# Altium PCB Zybo_Z7_Pcb.PcbDoc (part 5 of 8)
Units mm, origin at the board's own origin, x right, y up, seen from the top; angles counter-clockwise.
Board outline 122 x 88 mm, 8 copper layers (Top Layer, Layer 2, Layer 3, Layer 4, Layer 5, Layer 6, Layer 7, Bottom Layer), stack 1.625 mm thick; 658 components, 558 nets, 2538 pads, 924 vias.
Unrouted connection lines stored in the file: 1229.
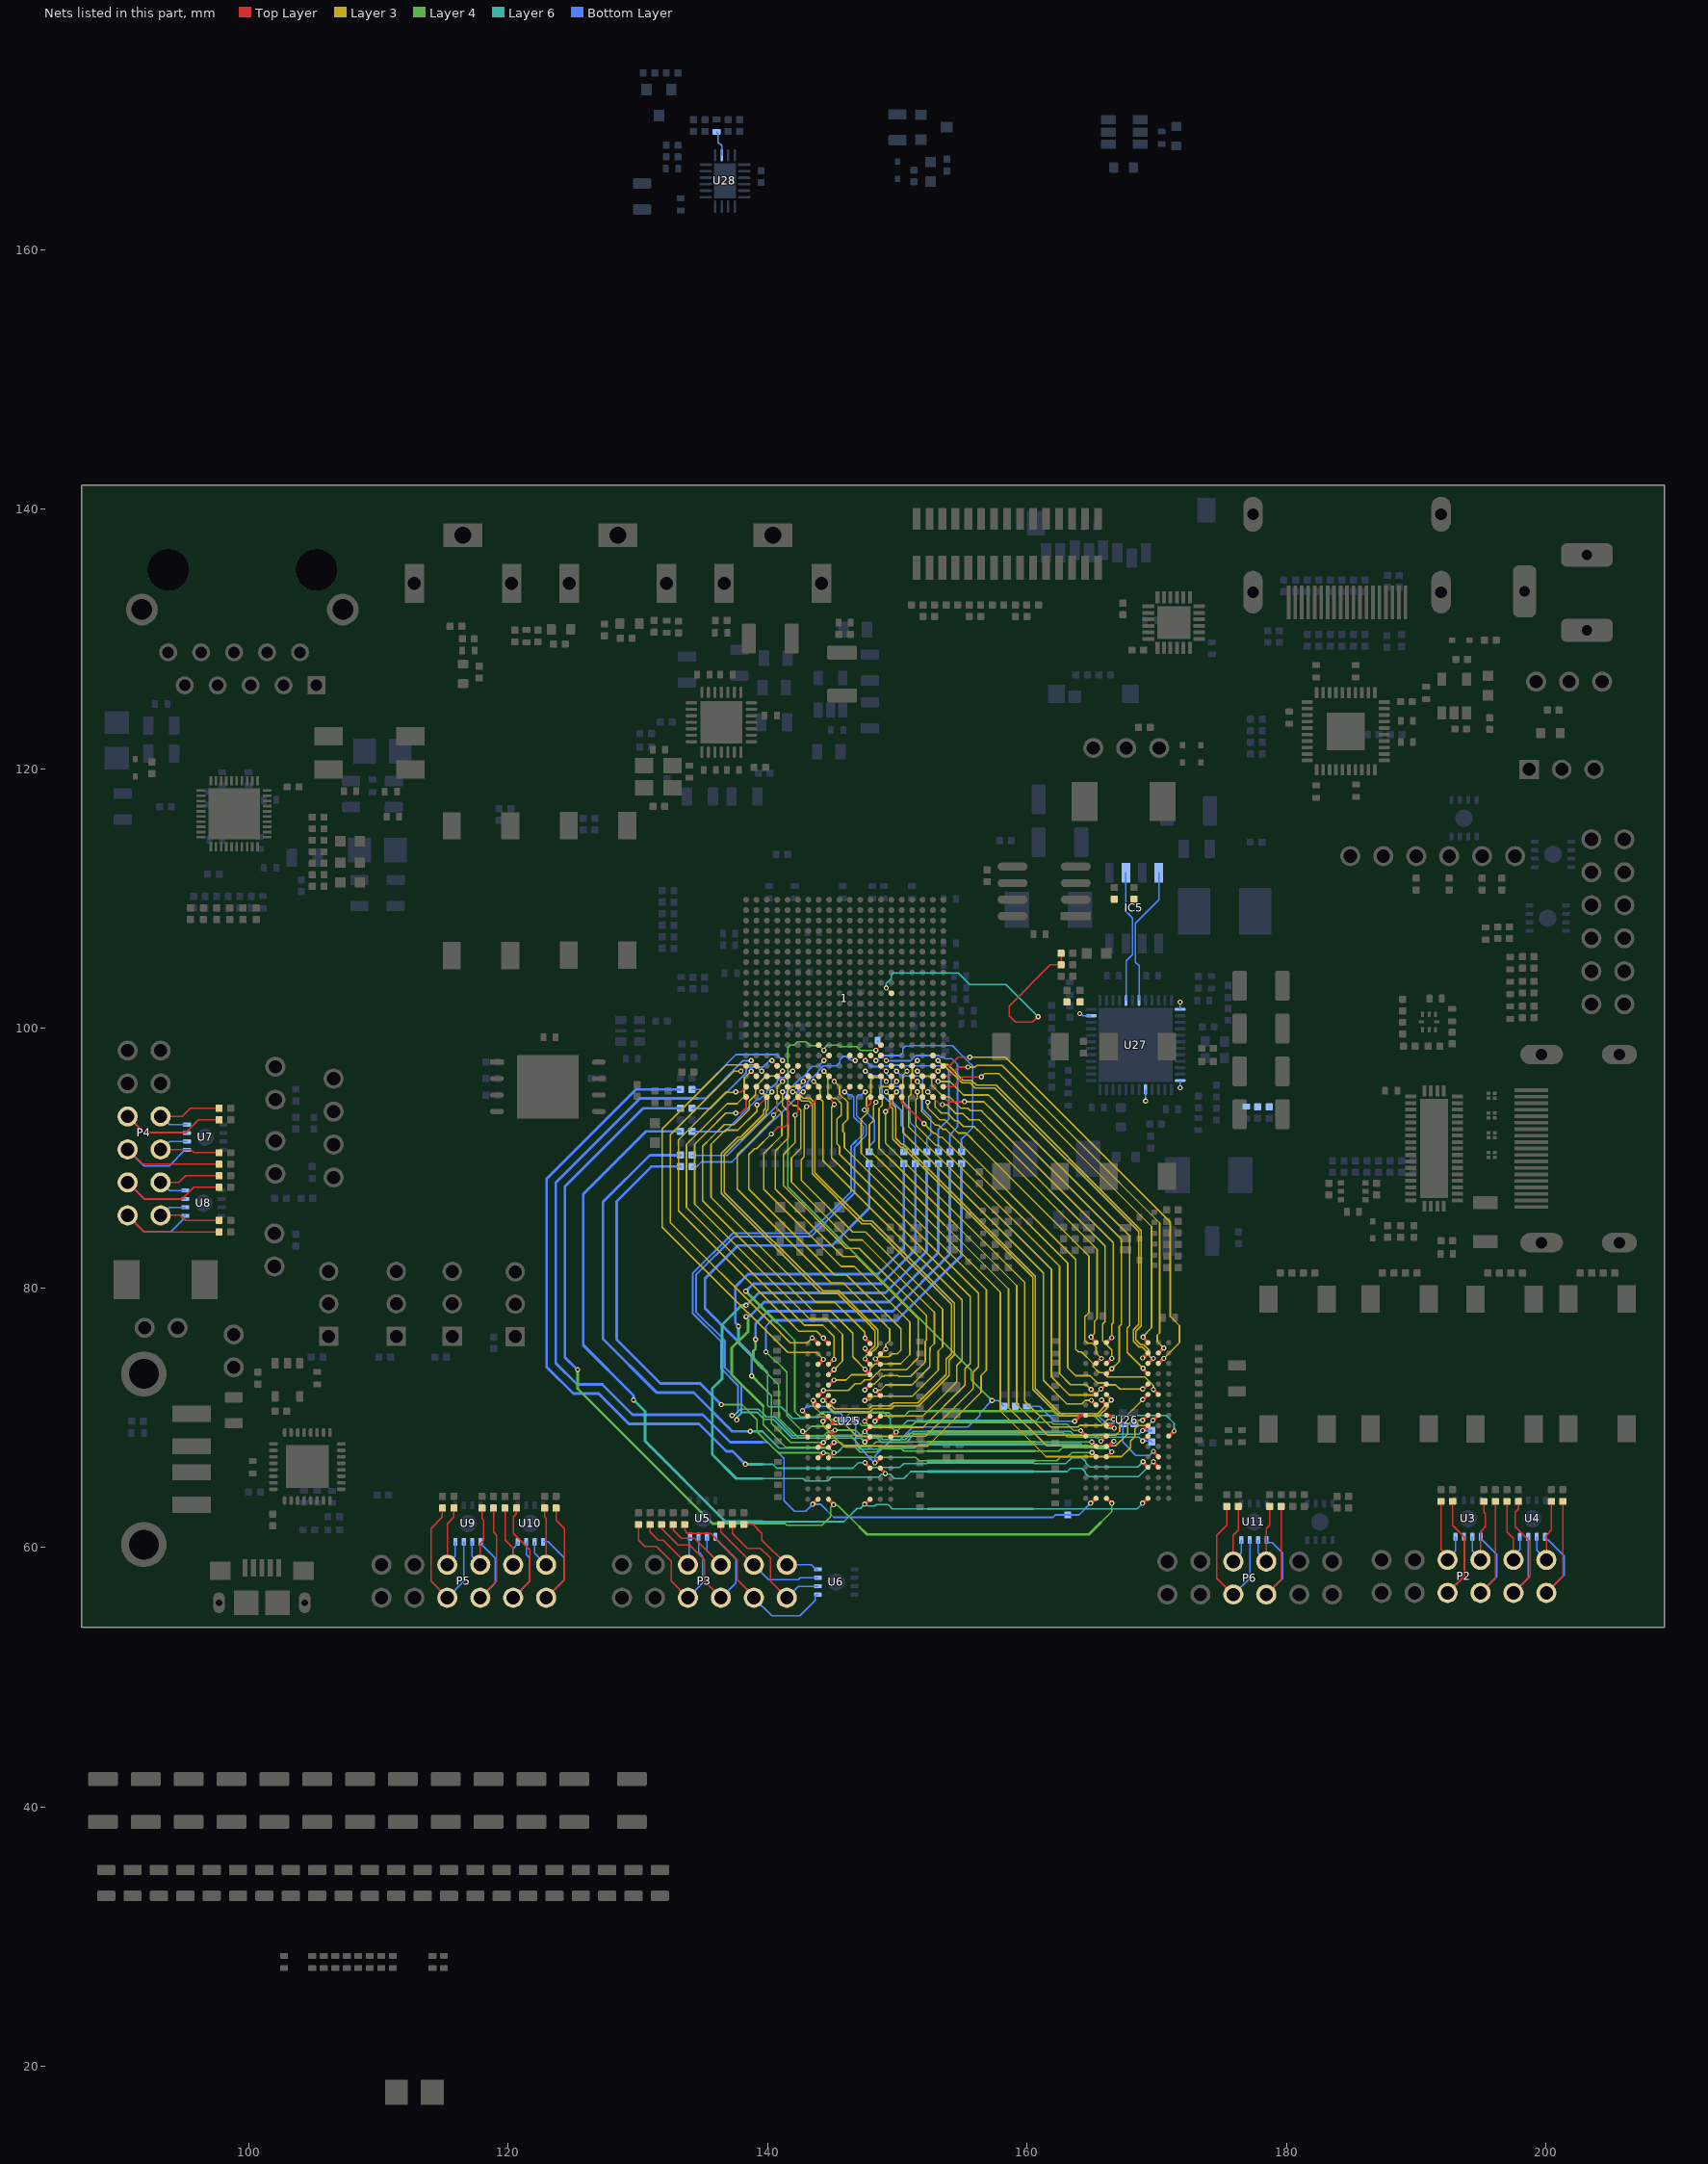
[diagram p10: the nets of this part, all layers, seen from the top]

## Via types
v1: diameter 0.4, hole 0.2, Top Layer to Bottom Layer, 249 vias
v2: diameter 0.4/0.2/0.2/0.2/0.2/0.2/0.2/0.2 (per signal layer), hole 0.2, Top Layer to Bottom Layer, 148 vias
v3: diameter 0.4/0.2/0.4/0.2/0.2/0.2/0.2/0.2 (per signal layer), hole 0.2, Top Layer to Bottom Layer, 136 vias
v4: diameter 0.4/0.2/0.2/0.4/0.2/0.2/0.2/0.2 (per signal layer), hole 0.2, Top Layer to Bottom Layer, 98 vias
v5: diameter 0.4/0.2/0.2/0.2/0.2/0.4/0.2/0.2 (per signal layer), hole 0.2, Top Layer to Bottom Layer, 68 vias
v6: diameter 0.4/0.4/0.2/0.2/0.4/0.2/0.4/0.4 (per signal layer), hole 0.2, Top Layer to Bottom Layer, 62 vias
v7: diameter 0.5, hole 0.2, Top Layer to Bottom Layer, 52 vias
v8: diameter 0.4/0.2/0.2/0.2/0.2/0.2/0.2/0.4 (per signal layer), hole 0.2, Top Layer to Bottom Layer, 31 vias
v9: diameter 0.5, hole 0.3, Top Layer to Bottom Layer, 25 vias
v10: diameter 0.4/0.4/0.2/0.2/0.4/0.4/0.4/0.4 (per signal layer), hole 0.2, Top Layer to Bottom Layer, 20 vias
v11: diameter 0.2/0.2/0.2/0.4/0.2/0.2/0.2/0.4 (per signal layer), hole 0.2, Top Layer to Bottom Layer, 15 vias
v12: diameter 0.2/0.2/0.2/0.2/0.2/0.4/0.2/0.4 (per signal layer), hole 0.2, Top Layer to Bottom Layer, 11 vias
v13: diameter 0.4/0.4/0.4/0.4/0.4/0.4/0.4/0.4 (per signal layer), hole 0.2, Top Layer to Bottom Layer, 5 vias
v14: diameter 0.4/0.2/0.2/0.2/0.2/0.4/0.2/0.4 (per signal layer), hole 0.2, Top Layer to Bottom Layer, 2 vias
v15: diameter 0.2/0.4/0.4/0.4/0.4/0.4/0.4/0.4 (per signal layer), hole 0.2, Top Layer to Bottom Layer, 2 vias

## Nets (pads, with @x,y where several pads share a name; then routed paths per layer and width w, separated by ;. In a path a pad name is that pad's centre, name@x,y a point inside that pad or via, vN(x,y) a via of type N, cw(c..) or ccw(c..) an arc to the next point about the centre after c; other vN are vias at no path point) (continued)
DDR3_A12: R213.2 U25.N7 U26.N7 | length 79.2
  Top Layer w0.254: v5@147.512,66.524 U25.N7@147.894,66.142 ; v5@168.935,66.596 U26.N7@169.316,66.215
  Layer 6 w0.124: 139.587,66.421 140.405,66.421 140.71,66.116 146.572,66.116 146.999,66.543 v5(147.512,66.543) 147.888,66.167 150.19,66.167 150.495,66.472 152.253,66.472 152.349,66.568 ; 160.441,66.568 160.537,66.472 162.992,66.472 163.447,66.927 164.227,66.927 164.536,66.618 164.536,66.512 164.845,66.203 168.523,66.203 v5(168.935,66.615)
  Layer 6 w0.205: v12(138.292,66.421) 139.587,66.421 ; 152.349,66.568 160.441,66.568
  Bottom Layer w0.207: R213.2@133.281,95.301 129.851,95.301 122.965,88.415 122.965,73.916 125.02,71.861 126.976,71.861 129.312,69.524 134.714,69.524 136.822,67.416 137.297,67.416 v12(138.292,66.421)
DDR3_A12_FPGA: 1.E4 R213.1 | length 8.8
  Top Layer w0.05: v8(141.142,97.518) 1.E4@141.542,97.118
  Bottom Layer w0.131: R213.1@134.181,95.301 134.874,95.301 137.571,97.998 140.662,97.998 v8(141.142,97.518)
DDR3_A13: R211.2 U25.T3 U26.T3 | length 77.4
  Top Layer w0.254: U25.T3@144.694,63.705 v4@145.075,63.323 ; U26.T3@166.135,63.796 v4@166.516,63.414
  Layer 4 w0.125: 136.271,61.849 141.351,61.849 141.478,61.722 144.194,61.722 144.871,62.399 144.871,63.094 145.075,63.299 v4(145.075,63.305) 145.128,63.252 145.423,63.252 147.08,61.595 ; 165.679,61.925 166.535,62.781 v4(166.535,63.414)
  Layer 4 w0.205: v11(125.363,73.711) 125.363,72.249 135.763,61.849 136.271,61.849 ; 147.08,61.595 147.659,61.017 164.77,61.017 165.679,61.925
  Bottom Layer w0.207: v11(125.363,73.711) 125.311,73.711 124.379,74.643 124.379,87.83 130.402,93.853 R211.2@133.281,93.853
DDR3_A13_FPGA: 1.D4 R211.1 | length 8.4
  Top Layer w0.05: v8(140.342,97.518) 1.D4@140.742,97.118
  Bottom Layer w0.131: R211.1@134.181,93.828 135.594,93.828 138.342,96.576 138.342,96.835 138.54,97.034 139.657,97.034 140.09,97.467 140.291,97.467 v8(140.342,97.518)
DDR3_A14: R209.2 U25.T7 U26.T7 | length 73.5
  Top Layer w0.254: v5@147.493,63.342 U25.T7@147.875,63.724 ; v5@168.916,63.414 U26.T7@169.298,63.796
  Layer 6 w0.124: 139.587,62.001 145.887,62.001 146.903,63.017 147.15,63.017 v5(147.475,63.342) 147.549,63.342 147.696,63.195 148.249,63.195 148.376,63.322 149.29,63.322 149.62,62.992 152.349,62.992 ; 160.441,62.992 168.475,62.992 v5(168.897,63.414)
  Layer 6 w0.205: v12(129.667,71.374) 130.556,70.485 130.556,68.213 136.768,62.001 139.587,62.001 ; 152.349,62.992 160.441,62.992
  Bottom Layer w0.207: v12(129.667,71.374) 129.667,71.724 125.792,75.599 125.792,87.244 130.623,92.075 R209.2@133.281,92.075
DDR3_A14_FPGA: 1.F4 R209.1 | length 10.4
  Top Layer w0.05: v8(141.942,96.718) 1.F4@142.342,97.118
  Bottom Layer w0.131: R209.1@134.181,92.05 136.688,92.05 139.178,94.539 139.409,94.539 139.963,95.093 139.963,95.185 140.254,95.476 140.346,95.476 140.742,95.872 140.742,95.964 141.011,96.234 141.257,96.234 141.69,96.667 141.891,96.667 v8(141.942,96.718)
DDR3_BA0: R231.2 U25.M2 U26.M2 | length 59
  Top Layer w0.254: U25.M2@143.912,66.924 v4@144.294,67.305 ; v4(164.998,67.326) 164.998,67.32 165.304,67.015 U26.M2@165.316,67.015
  Layer 4 w0.125: v11(136.438,71.018) 138.024,71.018 139.192,69.85 139.192,68.925 140.811,67.305 v4(144.313,67.305) 144.355,67.262 144.699,67.262 145.007,66.954 151.409,66.954 151.676,66.688 152.349,66.688 ; 160.579,66.688 162.305,66.688 162.596,66.98 163.121,66.98 163.467,67.326 v4(164.998,67.326)
  Layer 4 w0.205: 152.349,66.688 160.579,66.688
  Bottom Layer w0.207: R231.2@133.281,89.357 131.041,89.357 128.365,86.681 128.365,76.025 131.741,72.649 134.808,72.649 v11(136.438,71.018)
DDR3_BA0_FPGA: 1.L5 R231.1 | length 17.2
  Top Layer w0.05: 1.L5@146.342,97.918 v8(146.742,97.518)
  Bottom Layer w0.131: R231.1@134.181,89.332 134.518,89.332 134.899,89.713 137.262,89.713 140.578,93.029 140.593,93.029 140.723,93.16 140.778,93.214 140.778,93.229 142.258,94.709 142.258,95.08 142.701,95.523 142.793,95.523 143.068,95.797 143.068,95.89 143.431,96.254 143.524,96.254 143.898,96.627 143.898,96.72 144.291,97.114 145.297,97.114 145.559,97.375 145.559,97.581 145.811,97.834 146.083,97.834 146.347,97.569 146.691,97.569 v8(146.742,97.518)
DDR3_BA1: R230.2 U25.N8 U26.N8 | length 72.6
  Top Layer w0.254: U25.N8@148.694,66.105 v5@149.075,65.723 ; v5@169.735,66.596 U26.N8@170.116,66.215
  Layer 6 w0.124: 139.587,65.322 142.736,65.322 142.925,65.134 144.65,65.134 144.947,65.43 148.579,65.43 148.801,65.652 149.022,65.652 v5(149.075,65.705) 149.128,65.652 149.449,65.652 149.773,65.329 150.509,65.329 151.044,65.863 152.349,65.863 ; 160.441,65.863 163.094,65.863 163.339,66.108 164.227,66.108 164.497,65.837 164.497,65.736 164.768,65.465 168.585,65.465 v5(169.735,66.615)
  Layer 6 w0.205: v12(138.343,78.664) 137.987,78.664 136.489,77.165 136.489,73 135.727,72.238 135.727,67.183 137.587,65.322 139.587,65.322 ; 152.349,65.863 160.441,65.863
  Bottom Layer w0.207: v12(138.343,78.664) 138.774,79.095 ccw(c138.317,79.756) 138.888,79.191 139.327,79.629 149.071,79.629 152.273,82.831 R230.2@152.273,89.593
DDR3_BA1_FPGA: 1.R4 R230.1 | length 8.8
  Top Layer w0.05: 1.R4@149.542,97.118 v8(149.942,96.718)
  Bottom Layer w0.131: v8(149.942,96.718) 150.317,96.343 151.727,96.343 151.944,96.126 151.944,93.776 152.578,93.142 152.578,91.821 152.451,91.694 152.273,91.516 R230.1@152.273,90.493
DDR3_BA2: R229.2 U25.M3 U26.M3 | length 62.7
  Top Layer w0.254: U25.M3@144.712,66.924 v5@145.094,67.305 ; U26.M3@166.135,66.996 v5@166.516,67.377
  Layer 6 w0.124: 139.587,68.961 140.883,67.666 144.752,67.666 v5(145.113,67.305) 145.144,67.336 145.379,67.336 145.912,67.868 146.852,67.868 147.131,67.589 148.636,67.589 148.721,67.675 151.368,67.675 151.67,67.977 152.349,67.977 ; 160.441,67.977 164.179,67.977 164.414,67.742 166.171,67.742 v5(166.535,67.377)
  Layer 6 w0.205: v12(138.673,68.961) 139.587,68.961 ; 152.349,67.977 160.441,67.977
  Bottom Layer w0.207: R229.2@133.281,90.246 130.93,90.246 127.303,86.619 127.303,76.087 131.388,72.002 131.448,71.942 134.295,71.942 137.276,68.961 v12(138.673,68.961)
DDR3_BA2_FPGA: 1.J5 R229.1 | length 14
  Top Layer w0.05: v8(144.342,97.518) 1.J5@144.742,97.918
  Bottom Layer w0.131: R229.1@134.181,90.221 136.892,90.221 141.458,94.787 141.458,95.08 142.611,96.234 142.704,96.234 143.077,96.607 143.077,96.699 143.451,97.073 143.882,97.073 144.327,97.518 v8(144.342,97.518)
DDR3_CAS: R236.2 U25.K3 U26.K3 | length 60.1
  Top Layer w0.254: U25.K3@144.694,68.545 v4(145.196,69.048) ; v4(165.697,68.196) 165.707,68.196 166.088,68.577 U26.K3@166.098,68.577
  Layer 4 w0.125: 139.587,73.804 140.857,72.534 140.857,69.977 142.407,68.428 143.042,68.428 143.244,68.63 144.325,68.63 144.554,68.859 144.693,68.859 144.829,68.995 145.144,68.995 v4(145.196,69.048) 146.79,69.048 147.284,68.555 150.636,68.555 150.89,68.809 152.316,68.809 152.349,68.842 ; 160.579,68.885 162.738,68.885 163.115,68.508 164.489,68.508 164.663,68.682 165.211,68.682 v4(165.697,68.196)
  Layer 4 w0.205: v11(139.079,76.048) 139.079,75.331 138.902,75.153 138.902,74.49 139.587,73.804 ; 152.349,68.842 152.392,68.885 160.579,68.885
  Bottom Layer w0.131: 139.079,77.265 139.183,77.368
  Bottom Layer w0.207: v11(139.079,76.048) 139.079,77.265 ; 139.183,77.368 140.03,78.215 149.657,78.215 154.051,82.61 R236.2@154.051,89.593
DDR3_CAS_FPGA: 1.P5 R236.1 | length 13.5
  Top Layer w0.05: 1.P5@148.742,97.918 v8(149.142,97.518)
  Bottom Layer w0.131: v8(149.142,97.518) 151.028,97.518 151.426,97.917 153.189,97.917 153.312,97.794 153.548,97.794 153.675,97.667 154.191,97.667 154.635,97.223 154.635,92.405 154.051,91.821 R236.1@154.051,90.493
DDR3_CK_N: 1.M2 R242.1 U25.K7 U26.K7 | length 72.3
  Top Layer w0.05: 1.M2@147.142,95.518 v8(147.542,95.118)
  Top Layer w0.254: v5@147.512,68.142 U25.K7@147.894,68.524 ; v14@168.916,68.214 U26.K7@169.298,68.596
  Layer 6 w0.104: 139.587,70.043 139.626,70.004 139.653,70.004 139.783,69.874 140.461,69.874 141.9,68.436 144.81,68.436 144.814,68.44 147.196,68.44 v5(147.493,68.142) 147.791,68.44 148.465,68.44 148.784,68.121 150.681,68.121 151.297,68.737 152.33,68.737 152.349,68.718 ; 160.441,68.718 160.46,68.737 163.256,68.737 163.486,68.508 165.126,68.508 165.13,68.512 168.6,68.512 v14(168.897,68.214)
  Layer 6 w0.143: v15(137.621,69.835) 137.67,69.884 137.67,70.066 138.024,70.42 139.21,70.42 139.587,70.043 ; 152.349,68.718 160.441,68.718
  Bottom Layer w0.122: 147.028,91.161 147.065,91.198 147.065,91.225 147.085,91.245 147.085,91.271 147.619,91.805 147.619,92.513 146.853,93.278 146.853,94.735 147.01,94.892 147.241,94.892 147.467,95.118 v8(147.542,95.118) ; v14(168.897,68.214) 169.537,68.214 R242.1@169.621,68.13
  Bottom Layer w0.16: v15(137.621,69.835) 137.667,69.881 137.667,70.051 137.968,70.352 137.968,72.612 136.692,73.889 136.692,75.958 134.482,78.168 134.482,81.022 137.418,83.958 143.343,83.958 146.685,87.3 146.685,90.818 147.028,91.161
DDR3_CK_P: 1.L2 R242.2 U25.J7 U26.J7 | length 72.3
  Top Layer w0.05: v8(145.942,95.118) 1.L2@146.342,95.518
  Top Layer w0.254: v5@147.512,68.942 U25.J7@147.894,69.324 ; v14@168.916,69.014 U26.J7@169.298,69.396
  Layer 6 w0.104: 139.759,70.214 139.797,70.176 139.797,70.162 139.881,70.079 140.546,70.079 141.984,68.64 144.725,68.64 144.729,68.644 147.196,68.644 v5(147.493,68.942) 147.791,68.644 148.55,68.644 148.868,68.326 150.597,68.326 151.212,68.942 152.33,68.942 152.349,68.961 ; 160.408,68.961 160.422,68.961 160.441,68.942 163.341,68.942 163.57,68.713 165.041,68.713 165.045,68.717 168.6,68.717 v14(168.897,69.014)
  Layer 6 w0.143: v15(137.267,70.189) 137.317,70.238 137.498,70.238 137.923,70.663 139.31,70.663 139.759,70.214 ; 152.349,68.961 160.408,68.961
  Bottom Layer w0.122: v8(145.942,95.118) 146.017,95.118 146.243,94.892 146.474,94.892 146.631,94.735 146.631,93.186 147.396,92.421 147.396,91.897 146.844,91.345 ; v14(168.897,69.014) 169.606,69.014 R242.2@169.621,69.03
  Bottom Layer w0.16: v15(137.267,70.189) 137.313,70.235 137.483,70.235 137.708,70.46 137.708,72.505 136.432,73.781 136.432,75.851 134.222,78.06 134.222,81.13 137.31,84.218 143.235,84.218 146.425,87.408 146.425,90.173 146.425,90.926 146.558,91.059 146.66,91.161 146.844,91.345
DDR3_CKE0: R241.2 U25.K9 U26.K9 | length 66.3
  Top Layer w0.254: U25.K9@149.512,68.524 v5@149.894,68.905 ; U26.K9@170.935,68.596 v5@171.317,68.977
  Layer 6 w0.124: 139.587,73.939 139.994,73.533 139.994,70.937 140.09,70.841 141.035,70.841 141.924,69.952 143.067,69.952 143.156,70.04 143.791,70.04 144.185,70.434 148.953,70.434 149.471,69.917 149.471,69.347 v5(149.913,68.905) 150.781,69.774 152.349,69.774 ; 160.441,69.774 160.68,69.774 161.097,70.19 170.718,70.19 171.335,69.573 v5(171.335,68.977)
  Layer 6 w0.205: v12(137.759,77.038) 137.759,75.768 139.587,73.939 ; 152.349,69.774 160.441,69.774
  Bottom Layer w0.207: v12(137.759,77.038) 137.759,77.09 137.514,77.335 137.514,80.089 138.49,81.065 148.508,81.065 150.495,83.052 R241.2@150.495,89.593
DDR3_CKE0_FPGA: 1.N3 R241.1 | length 8.5
  Top Layer w0.05: v8(147.542,96.718) 1.N3@147.942,96.318
  Bottom Layer w0.131: v8(147.542,96.718) 147.893,96.367 148.529,96.367 148.728,96.168 148.728,95.624 148.813,95.539 148.813,94.903 149.304,94.412 149.558,94.412 150.303,93.667 150.303,92.535 150.495,92.343 R241.1@150.495,90.493
DDR3_CS: R237.2 U25.L2 U26.L2 | length 58.6
  Top Layer w0.254: U25.L2@143.912,67.724 v4@144.294,68.105 ; v4(164.993,68.151) 164.993,68.138 U26.L2@165.316,67.815
  Layer 4 w0.125: 139.587,72.415 140.299,71.704 140.299,69.596 141.789,68.105 v4(144.313,68.105) 144.635,68.428 144.693,68.428 144.845,68.58 146.407,68.58 147.157,67.83 148.032,67.83 148.34,68.137 152.349,68.137 ; 160.579,68.137 164.979,68.137 v4(164.993,68.151)
  Layer 4 w0.205: v11(138.775,73.228) 139.587,72.415 ; 152.349,68.137 160.579,68.137
  Bottom Layer w0.207: v11(138.775,73.228) 138.775,74.842 135.177,78.439 135.177,80.751 137.701,83.274 144.946,83.274 147.828,86.157 R237.2@147.828,89.593
DDR3_CS_FPGA: 1.N1 R237.1 | length 4.9
  Top Layer w0.131: v8(147.447,93.726) 147.942,94.221 1.N1@147.942,94.718
  Bottom Layer w0.131: v8(147.447,93.726) 148.234,92.939 148.234,91.338 147.828,90.932 R237.1@147.828,90.493
DDR3_D0: 1.E3 U25.E3 | length 35.1
  Top Layer w0.05: v3(141.142,95.918) 1.E3@141.542,96.318
  Top Layer w0.254: U25.E3@144.712,72.524 v3@145.094,72.905
  Layer 3 w0.124: v3(141.142,95.918) 140.741,95.517 140.741,93.828 141.097,93.472 141.097,91.763 139.7,90.366 139.7,89.843 139.7,87.63 145.669,81.661 146.685,81.661 150.967,77.379 150.967,74.879 150.255,74.168 149.29,74.168 149.264,74.142 148.27,74.142 147.914,73.786 147.914,73.58 147.646,73.312 146.453,73.312 146.046,72.905 v3(145.113,72.905)
DDR3_D1: 1.H1 U25.F7 | length 34.1
  Top Layer w0.131: v3(143.002,93.98) 143.059,94.037 143.265,94.037 1.H1@143.942,94.715
  Top Layer w0.254: v3@147.512,71.342 U25.F7@147.894,71.724
  Layer 3 w0.124: v3(143.002,93.98) 143.002,93.942 142.829,93.769 142.829,91.161 142.829,90.17 142.829,90.13 142.586,89.886 142.586,88.3 146.558,84.328 147.55,84.328 153.486,78.392 153.486,75.474 153.151,75.14 153.151,73.662 151.144,71.655 148.146,71.655 147.88,71.389 147.54,71.389 v3(147.493,71.342)
DDR3_D2: 1.E2 U25.F2 | length 35.7
  Top Layer w0.05: v3(141.142,95.118) 1.E2@141.542,95.518
  Top Layer w0.254: U25.F2@143.912,71.724 v3@144.294,72.105
  Layer 3 w0.124: v3(141.142,95.118) 141.142,94.062 141.605,93.599 141.605,91.567 141.199,91.161 140.589,90.551 140.589,90.372 140.589,90.17 140.589,87.63 145.796,82.423 146.806,82.423 151.613,77.616 151.613,74.625 150.704,73.717 148.707,73.717 148.624,73.634 148.624,73.613 148.441,73.43 148.421,73.43 147.914,72.923 147.487,72.923 147.183,72.619 146.75,72.619 146.237,72.105 v3(144.313,72.105)
DDR3_D3: 1.G3 U25.F8 | length 35.1
  Top Layer w0.05: v3(142.742,95.918) 1.G3@143.142,96.318
  Top Layer w0.254: v3(148.312,72.124) 148.312,72.115 148.694,71.733 U25.F8@148.694,71.724
  Layer 3 w0.124: v3@142.749,95.918 142.353,95.522 141.782,95.522 141.543,95.283 141.543,94.499 141.986,94.056 142.218,94.056 142.568,93.706 142.568,91.161 142.568,90.752 141.986,90.17 141.838,90.022 141.838,88.165 146.299,83.704 147.292,83.704 152.861,78.134 152.861,75.733 152.527,75.398 152.527,75.184 152.514,75.171 152.514,73.927 151.13,72.542 149.108,72.542 148.699,72.133 148.321,72.133 v3(148.312,72.124)
DDR3_D4: 1.J3 U25.H3 | length 45.3
  Top Layer w0.05: 1.J3@144.742,96.318 v3(145.142,95.918)
  Top Layer w0.254: v3@144.293,69.742 U25.H3@144.675,70.124
  Layer 3 w0.124: v3(144.275,69.742) 144.275,69.379 145.236,68.417 145.242,68.417 145.425,68.235 145.425,68.229 145.824,67.83 152.336,67.83 156.457,71.952 156.457,73.265 156.869,73.677 156.869,79.855 146.49,90.234 146.177,90.547 146.177,90.551 145.923,90.805 145.923,91.948 145.811,92.06 145.811,92.639 146.177,93.004 146.177,94.324 145.549,94.952 145.549,95.52 v3@145.152,95.917
DDR3_D5: 1.H2 U25.H8 | length 36.7
  Top Layer w0.05: v3(143.542,95.918) 1.H2@143.942,95.518
  Top Layer w0.254: v3@148.293,69.742 U25.H8@148.675,70.124
  Layer 3 w0.124: v3@143.59,95.888 144.038,95.44 144.038,94.595 144.272,94.361 144.272,90.805 144.272,90.17 144.272,89.804 154.997,79.079 154.997,74.453 154.585,74.041 154.585,72.771 154.127,72.314 151.968,70.155 148.687,70.155 v3(148.275,69.742)
DDR3_D6: 1.H3 U25.G2 | length 46.3
  Top Layer w0.05: 1.H3@143.942,96.318 v3(144.342,96.718)
  Top Layer w0.254: v3@143.512,71.324 U25.G2@143.894,70.942
  Layer 3 w0.124: v3(143.512,71.343) 143.512,70.929 144.134,70.307 144.337,70.307 145.15,69.494 145.963,69.494 146.864,68.593 152.184,68.593 155.016,71.425 155.833,72.242 155.833,73.524 156.245,73.936 156.245,79.596 145.672,90.17 145.542,90.3 145.542,90.932 145.349,91.125 145.349,91.328 145.349,93.025 145.669,93.345 145.669,94.234 145.288,94.615 145.034,94.615 144.65,94.999 144.65,96.403 v3@144.335,96.718
DDR3_D7: 1.J1 U25.H7 | length 36.8
  Top Layer w0.131: 1.J1@144.742,94.718 v3(145.141,94.141)
  Top Layer w0.254: v3@147.493,69.742 U25.H7@147.875,70.124
  Layer 3 w0.124: v3(145.141,94.141) 144.938,93.938 144.938,91.003 144.938,90.17 144.938,90.021 155.621,79.338 155.621,74.195 155.209,73.782 155.209,72.512 151.962,69.266 147.951,69.266 v3(147.475,69.742)
DDR3_D8: 1.D3 U25.D7 | length 33.5
  Top Layer w0.05: 1.D3@140.742,96.318 v3(141.142,96.718)
  Top Layer w0.254: v3@147.512,73.724 U25.D7@147.894,73.342
  Layer 3 w0.124: v3(141.142,96.718) 140.766,96.342 139.9,96.342 139.064,95.506 139.064,94.893 138.582,94.412 138.582,93.762 137.424,92.604 136.673,92.604 135.674,91.605 135.001,90.932 135.001,89.154 135.001,86.741 143.495,78.247 144.835,78.247 144.85,78.232 144.856,78.232 145.72,77.368 146.558,76.53 146.558,74.697 v3(147.512,73.743)
DDR3_D9: 1.B3 U25.C3 | length 31.4
  Top Layer w0.05: v3(138.742,96.718) 1.B3@139.142,96.318
  Top Layer w0.254: U25.C3@144.712,74.124 v3@145.094,74.505
  Layer 3 w0.124: v3(138.742,96.718) 138.201,96.177 138.201,94.767 137.643,94.209 136.881,94.209 135.433,92.761 133.749,91.077 133.749,89.154 133.749,86.215 142.596,77.368 142.824,77.14 144.247,77.14 145.113,76.274 v3(145.113,74.505)
DDR3_D10: 1.E1 U25.C8 | length 29.3
  Top Layer w0.131: v3(140.284,91.872) 140.825,92.412 141.307,92.412 141.542,92.647 1.E1@141.542,94.715
  Top Layer w0.254: v3@148.312,74.524 U25.C8@148.694,74.142
  Layer 3 w0.124: v3(140.284,91.872) 139.141,90.729 138.989,90.729 138.557,90.297 138.557,89.154 138.557,87.63 145.161,81.026 146.095,81.026 149.752,77.368 150.267,76.854 150.267,75.207 149.994,74.934 149.579,74.934 149.351,74.706 148.523,74.706 148.359,74.543 v3(148.312,74.543)
DDR3_D11: 1.C3 U25.C2 | length 35.2
  Top Layer w0.05: v3(139.542,96.718) 1.C3@139.942,96.318
  Top Layer w0.254: U25.C2@143.912,74.124 v3@144.294,74.505
  Layer 3 w0.124: v3(139.542,96.718) 139.062,97.198 136.822,97.198 135.433,95.809 133.477,93.853 131.876,92.252 131.876,84.689 138.453,78.112 138.472,78.112 141.554,75.03 143.787,75.03 v3(144.313,74.505)
DDR3_D12: 1.C1 U25.A7 | length 27.3
  Top Layer w0.131: v3(139.192,94.107) 139.243,94.158 139.386,94.158 1.C1@139.942,94.715
  Top Layer w0.254: v3@147.512,76.124 U25.A7@147.894,75.742
  Layer 3 w0.124: v3(139.192,94.107) 139.192,93.643 137.71,92.16 136.737,92.16 135.928,91.351 135.636,91.059 135.636,89.154 135.636,86.995 143.713,78.918 145.161,78.918 146.71,77.368 147.485,76.594 147.485,76.17 v3(147.512,76.143)
DDR3_D13: 1.A4 U25.A2 | length 30.3
  Top Layer w0.05: v3(137.942,96.718) 1.A4@138.342,97.118
  Top Layer w0.254: v3@143.489,76.147 U25.A2@143.894,75.742
  Layer 3 w0.124: v3(137.942,96.718) 137.409,96.718 132.5,91.809 132.5,85.045 140.177,77.368 141.751,75.794 143.076,75.794 v3(143.43,76.147)
DDR3_D14: 1.D1 U25.B8 | length 26.8
  Top Layer w0.131: v3(140.462,93.345) 140.742,93.625 1.D1@140.742,94.715
  Top Layer w0.254: U25.B8@148.712,74.924 v3@149.094,75.305
  Layer 3 w0.124: v3(140.462,93.345) 140.462,93.04 140.081,92.659 138.582,91.161 137.668,90.246 137.668,89.154 137.668,87.63 144.907,80.391 145.847,80.391 148.869,77.368 149.403,76.835 149.403,75.94 149.113,75.649 v3(149.113,75.305)
DDR3_D15: 1.A2 U25.A3 | length 28.2
  Top Layer w0.131: v3(137.541,95.123) 137.95,95.123 1.A2@138.342,95.515
  Top Layer w0.254: v3@144.312,76.124 U25.A3@144.694,75.742
  Layer 3 w0.124: v3(137.541,95.123) 137.488,95.07 136.777,95.07 133.124,91.418 133.124,85.951 141.707,77.368 142.394,76.681 143.774,76.681 v3(144.312,76.143)
DDR3_D16: 1.U4 U26.E3 | length 34.9
  Top Layer w0.05: 1.U4@151.142,97.118 v3(151.542,97.518)
  Top Layer w0.254: v3@165.716,72.214 U26.E3@166.098,72.596
  Layer 3 w0.124: v3(151.542,97.518) 151.155,97.131 151.155,96.341 151.054,96.24 151.054,94.938 150.876,94.759 150.876,92.43 152.145,91.161 152.933,90.373 161.879,81.427 161.879,73.145 163.269,71.755 165.238,71.755 v3(165.697,72.214)
DDR3_D17: 1.R3 U26.F7 | length 43.8
  Top Layer w0.05: 1.R3@149.542,96.318 v3(149.942,95.918)
  Top Layer w0.254: v3@168.935,71.414 U26.F7@169.316,71.796
  Layer 3 w0.124: v3(149.942,95.918) 149.543,95.519 148.797,95.519 148.654,95.376 148.654,94.789 148.839,94.604 148.839,94.081 148.59,93.832 148.59,90.784 149.686,89.687 159.197,80.177 159.197,71.043 161.583,68.656 166.826,68.656 167.146,68.977 167.146,69.645 v3(168.916,71.414)
DDR3_D18: 1.U2 U26.F2 | length 30.5
  Top Layer w0.05: 1.U2@151.142,95.518 v3(151.542,95.118)
  Top Layer w0.254: v3(164.935,72.196) U26.F2@165.316,71.815
  Layer 3 w0.124: v3(151.542,95.118) 151.542,94.621 151.435,94.513 151.435,92.532 152.97,90.997 153.192,90.997 162.503,81.686 162.503,73.403 163.339,72.567 164.563,72.567 v3(164.935,72.196)
DDR3_D19: 1.U3 U26.F8 | length 34.7
  Top Layer w0.05: 1.U3@151.142,96.318 v3(151.542,95.918)
  Top Layer w0.254: v3(169.735,72.196) 169.735,72.187 170.116,71.805 U26.F8@170.116,71.796
  Layer 3 w0.124: v3(151.542,95.918) 151.941,95.519 151.941,94.714 151.88,94.653 151.88,93.611 152.933,92.558 153.176,92.558 153.487,92.246 153.709,92.246 163.752,82.203 163.752,75.284 163.969,75.068 164.2,75.068 165.1,74.168 165.1,73.949 165.565,73.484 165.849,73.484 166.181,73.152 169.077,73.152 169.737,72.492 169.737,72.199 v3(169.735,72.196)
DDR3_D20: 1.R1 U26.H3 | length 36.6
  Top Layer w0.131: v3(149.098,93.599) 149.542,94.043 1.R1@149.542,94.715
  Top Layer w0.254: U26.H3@166.116,70.196 166.144,70.168 166.37,70.168 v3(166.66,69.878)
  Layer 3 w0.124: v3(149.098,93.599) 149.098,91.159 159.821,80.436 159.821,71.301 161.831,69.291 163.921,69.291 164.048,69.418 165.775,69.418 166.235,69.878 v3(166.66,69.878)
DDR3_D21: 1.P3 U26.H8 | length 47.9
  Top Layer w0.05: 1.P3@148.742,96.318 v3(149.142,95.918)
  Top Layer w0.254: v3@169.716,69.814 U26.H8@170.098,70.196
  Layer 3 w0.124: v3(149.142,95.918) 148.83,96.23 148.199,96.23 147.959,95.99 147.959,94.993 147.627,94.661 147.627,93.988 147.759,93.855 147.759,93.572 147.218,93.032 147.218,91.161 147.218,90.389 147.92,89.687 157.937,79.67 157.937,70.536 161.459,67.014 167.282,67.014 167.97,67.701 167.97,68.209 168.318,68.558 168.318,69.155 168.572,69.409 169.292,69.409 v3(169.697,69.814)
DDR3_D22: 1.T4 U26.G2 | length 34.1
  Top Layer w0.05: 1.T4@150.342,97.118 v3(150.742,96.718)
  Top Layer w0.254: v3(164.949,71.352) 165.287,71.015 U26.G2@165.316,71.015
  Layer 3 w0.124: v3(150.742,96.718) 150.419,96.395 150.419,92.004 161.255,81.168 161.255,72.886 163.057,71.083 164.227,71.083 164.496,71.352 v3(164.949,71.352)
DDR3_D23: 1.P1 U26.H7 | length 42
  Top Layer w0.05: v3(148.342,94.318) 1.P1@148.742,94.718
  Top Layer w0.254: v3@168.916,69.814 U26.H7@169.298,70.196
  Layer 3 w0.124: v3(148.342,94.318) 148.342,94.243 148.158,94.06 148.158,92.888 147.853,92.583 147.853,91.161 147.853,90.637 148.803,89.687 158.572,79.918 158.572,70.784 161.518,67.838 166.837,67.838 167.756,68.758 167.756,69.444 168.127,69.814 v3(168.897,69.814)
DDR3_D24: 1.W3 U26.D7 | length 31.6
  Top Layer w0.05: 1.W3@152.742,96.318 v3(153.142,95.918)
  Top Layer w0.254: v3@168.935,73.796 U26.D7@169.316,73.415
  Layer 3 w0.124: v3(153.142,95.918) 154.062,95.918 155.111,94.869 156.718,94.869 157.034,94.869 157.353,94.55 167.892,84.011 167.892,78.13 167.892,77.097 167.705,76.91 167.705,75.044 v3(168.935,73.815)
DDR3_D25: 1.W1 U26.C3 | length 27.6
  Top Layer w0.05: 1.W1@152.742,94.718 153.261,94.199 153.4,94.199 v3(153.467,94.132)
  Top Layer w0.254: U26.C3@166.135,74.196 v3@166.516,74.577
  Layer 3 w0.124: v3(153.467,94.132) 153.492,94.107 153.844,94.107 154.504,93.447 155.045,93.447 155.539,92.952 156.302,92.952 156.718,92.536 157.353,91.901 166.019,83.235 166.019,78.13 166.019,77.423 165.826,77.23 165.826,75.946 166.535,75.236 v3(166.535,74.577)
DDR3_D26: 1.Y4 U26.C8 | length 34.9
  Top Layer w0.131: 1.Y4@153.542,97.118 154.014,97.118 154.686,97.79 v3(155.575,97.79)
  Top Layer w0.254: U26.C8@170.135,74.196 v3@170.516,74.577
  Layer 3 w0.124: v3(155.575,97.79) 156.954,97.79 ; v3(170.535,74.577) 171.747,75.789 171.747,77.097 171.044,77.8 171.044,78.08 171.044,78.107
  Layer 3 w0.131: 156.954,97.79 158.336,97.79 165.044,91.082 165.044,91.072 171.044,85.073 171.044,78.107
DDR3_D27: 1.V1 U26.C2 | length 27.5
  Top Layer w0.05: 1.V1@151.942,94.718 v3(152.342,94.318)
  Top Layer w0.254: U26.C2@165.335,74.196 v3@165.717,74.577
  Layer 3 w0.124: v3(152.342,94.318) 152.342,93.886 152.933,93.294 153.264,92.964 153.67,92.964 154.686,91.948 155.286,91.948 155.54,91.694 156.073,91.161 164.77,82.464 164.77,78.13 164.77,78.105 164.454,77.789 164.454,75.957 164.663,75.748 165.024,75.748 165.325,75.447 165.325,74.987 v3(165.735,74.577)
DDR3_D28: 1.Y2 U26.A7 | length 30.7
  Top Layer w0.131: 1.Y2@153.542,95.518 154.319,95.518 155.067,96.266 v3(156.464,96.266)
  Top Layer w0.254: v3@168.935,76.196 U26.A7@169.316,75.815
  Layer 3 w0.124: v3(156.464,96.266) 156.718,96.52 157.353,96.52 157.826,96.52 169.596,84.75 169.596,78.13 169.596,76.935 168.935,76.274 v3(168.935,76.215)
DDR3_D29: 1.V2 U26.A2 | length 26.5
  Top Layer w0.05: 1.V2@151.942,95.518 v3(152.342,95.118)
  Top Layer w0.254: v3@164.935,76.196 U26.A2@165.316,75.815
  Layer 3 w0.124: v3(152.342,95.118) 152.908,94.552 152.908,93.967 152.933,93.942 153.391,93.484 153.855,93.484 154.441,92.899 154.656,92.899 155.102,92.453 155.918,92.453 156.677,91.694 156.718,91.653 165.394,82.977 165.394,78.13 165.394,77.638 165.191,77.434 165.191,76.51 164.935,76.254 v3(164.935,76.215)
DDR3_D30: 1.Y3 U26.B8 | length 32.5
  Top Layer w0.131: 1.Y3@153.545,96.318 153.976,96.318 154.686,97.028 v3(155.448,97.028)
  Top Layer w0.254: U26.B8@170.135,74.996 v3@170.516,75.377
  Layer 3 w0.124: v3(155.448,97.028) 155.998,97.028 156.129,97.159 157.353,97.159 ; 164.219,91.009 170.22,85.009 170.22,78.13 170.22,76.55 170.031,76.361 170.031,75.882 v3(170.535,75.377)
  Layer 3 w0.131: 157.353,97.159 158.074,97.159 164.222,91.012
DDR3_D31: 1.V3 U26.A3 | length 29.3
  Top Layer w0.05: v3(151.542,96.718) 1.V3@151.942,96.318
  Top Layer w0.254: U26.A3@166.135,75.796 v3@166.516,76.177
  Layer 3 w0.124: v3(151.542,96.718) 151.944,96.316 152.463,96.316 152.661,96.118 152.661,95.626 152.933,95.354 153.545,94.742 154.007,94.742 154.896,93.853 155.439,93.853 155.621,93.671 156.466,93.671 156.718,93.419 157.353,92.784 166.643,83.494 166.643,78.13 166.643,77.337 166.535,77.229 v3(166.535,76.177)
DDR3_DM0: 1.F1 U25.E7 | length 32.2
  Top Layer w0.131: v3(142.126,93.319) 142.126,93.391 142.342,93.607 1.F1@142.342,94.715
  Top Layer w0.254: v3@147.512,72.142 U25.E7@147.894,72.524
  Layer 3 w0.124: v3(142.126,93.319) 142.126,91.199 142.088,91.161 141.213,90.286 141.213,90.17 141.213,87.895 146.05,83.058 147.054,83.058 152.237,77.875 152.237,75.992 152.146,75.9 152.146,74.295 151.028,73.177 150.119,73.177 150.042,73.254 149.02,73.254 148.943,73.177 148.808,73.177 148.223,72.593 147.945,72.593 v3(147.493,72.142)
DDR3_DM1: 1.A1 U25.D3 | length 29.6
  Top Layer w0.131: v3(137.541,93.472) 137.556,93.487 137.937,93.487 138.342,93.892 138.342,94.715 1.A1@138.345,94.718
  Top Layer w0.254: U25.D3@144.712,73.324 v3@145.094,73.705
  Layer 3 w0.124: v3(137.541,93.472) 136.779,93.472 135.433,92.126 134.377,91.07 134.377,89.154 134.377,86.476 143.078,77.775 143.084,77.775 143.237,77.622 144.577,77.622 144.831,77.368 145.771,76.429 145.771,74.363 v3(145.113,73.705)
DDR3_DM2: 1.T1 U26.E7 | length 33.4
  Top Layer w0.131: 1.T1@150.342,94.718 150.342,94.26 150.977,93.625 151.104,93.625 v3(152.07,92.659)
  Top Layer w0.254: v3@168.935,72.214 U26.E7@169.316,72.596
  Layer 3 w0.124: v3(152.07,92.659) 152.812,91.917 152.933,91.917 153.229,91.622 153.451,91.622 163.128,81.944 163.128,73.878 163.757,73.248 164.847,73.248 165.415,72.68 166.105,72.68 166.243,72.542 166.827,72.542 167.155,72.214 v3(168.916,72.214)
DDR3_DM3: 1.Y1 U26.D3 | length 29.1
  Top Layer w0.131: 1.Y1@153.545,94.718 153.555,94.718 153.912,94.361 v3(155.169,94.361)
  Top Layer w0.254: U26.D3@166.135,73.396 v3@166.516,73.777
  Layer 3 w0.124: v3(155.169,94.361) 156.659,94.361 156.718,94.302 157.353,93.667 167.268,83.752 167.268,78.13 167.268,77.199 167.107,77.038 167.107,74.349 v3(166.535,73.777)
DDR3_DQS0_N: 1.F2 U25.G3 | length 39.6
  Top Layer w0.05: v3(141.942,95.118) 1.F2@142.342,95.518
  Top Layer w0.254: U25.G3@144.694,70.924 v3@145.075,71.305
  Layer 3 w0.104: v3(141.942,95.118) 141.999,95.061 142.176,95.061 142.24,94.998 142.24,94.827 142.651,94.416 143.19,94.416 143.444,94.162 143.444,91.161 143.444,90.17 143.444,88.804 147.285,84.963 147.955,84.963 154.178,78.74 154.178,74.93 153.766,74.518 153.766,73.349 151.562,71.145 149.68,71.145 149.445,70.911 148.04,70.911 147.817,70.688 145.16,70.688 144.787,71.062 144.787,71.149 144.887,71.249 145.037,71.249 v3(145.094,71.305)
DDR3_DQS0_P: 1.G2 U25.F3 | length 40.3
  Top Layer w0.05: v3(142.742,95.118) 1.G2@143.142,95.518
  Top Layer w0.254: v3@144.293,71.342 U25.F3@144.675,71.724
  Layer 3 w0.104: v3(142.742,95.118) 142.685,95.061 142.508,95.061 142.444,94.998 142.444,94.911 142.735,94.62 143.274,94.62 143.648,94.246 143.648,91.161 143.648,90.17 143.648,88.889 147.369,85.168 148.04,85.168 154.383,78.825 154.383,74.845 153.97,74.433 153.97,73.265 151.647,70.941 149.764,70.941 149.53,70.707 148.125,70.707 147.902,70.484 145.076,70.484 144.582,70.977 144.582,71.149 144.521,71.21 144.487,71.21 144.355,71.342 v3(144.275,71.342)
DDR3_DQS1_N: 1.B2 U25.B7 | length 29.1
  Top Layer w0.05: 1.B2@139.142,95.518 v3(139.542,95.118)
  Top Layer w0.254: v3@147.512,75.324 U25.B7@147.894,74.942
  Layer 3 w0.104: v3(139.542,95.118) 139.84,94.82 139.84,93.856 139.7,93.716 139.7,93.422 137.923,91.645 137.71,91.645 137.226,91.161 136.447,90.382 136.447,89.154 136.447,87.291 144.167,79.572 145.421,79.572 147.625,77.368 148.285,76.708 148.285,75.575 147.755,75.045 147.668,75.045 147.569,75.145 147.569,75.286 v3(147.512,75.343)
DDR3_DQS1_P: 1.C2 U25.C7 | length 29.5
  Top Layer w0.05: 1.C2@139.942,95.518 v3(140.342,95.118)
  Top Layer w0.254: v3@147.512,74.524 U25.C7@147.894,74.142
  Layer 3 w0.104: v3(140.342,95.118) 140.044,94.82 140.044,93.771 139.905,93.631 139.905,93.337 138.008,91.44 137.795,91.44 137.516,91.161 136.652,90.297 136.652,89.154 136.652,87.376 144.251,79.777 145.506,79.777 147.914,77.368 148.49,76.793 148.49,75.49 147.84,74.84 147.668,74.84 147.569,74.741 147.569,74.599 v3(147.512,74.543)
DDR3_DQS2_N: 1.T2 U26.G3 | length 35.7
  Top Layer w0.05: v3(149.942,95.118) 1.T2@150.342,95.518
  Top Layer w0.254: v3(165.738,71.366) U26.G3@166.108,70.996
  Layer 3 w0.104: v3(149.942,95.118) 149.644,94.82 149.644,94.132 149.86,93.917 149.86,91.567 150.368,91.059 150.495,91.059 160.64,80.914 160.64,72.253 162.554,70.339 165.442,70.339 166.016,70.912 166.016,71.094 165.743,71.366 v3(165.738,71.366)
DDR3_DQS2_P: 1.R2 U26.F3 | length 36.4
  Top Layer w0.05: v3(149.142,95.118) 1.R2@149.542,95.518
  Top Layer w0.254: U26.F3@166.116,71.777 v3@166.498,71.396
  Layer 3 w0.104: v3(149.142,95.118) 149.44,94.82 149.44,94.048 149.655,93.832 149.655,91.482 150.283,90.854 150.41,90.854 160.436,80.829 160.436,72.168 162.469,70.134 165.527,70.134 166.22,70.827 166.22,71.094 166.498,71.371 v3(166.498,71.377)
DDR3_DQS3_N: 1.W4 U26.B7 | length 32.6
  Top Layer w0.05: 1.W4@152.742,97.118 v3(153.142,96.718)
  Top Layer w0.254: v3@168.916,74.614 U26.B7@169.298,74.996
  Layer 3 w0.104: v3(153.142,96.718) 153.44,97.016 153.774,97.016 154.983,95.806 155.618,95.806 156.004,95.42 156.718,95.42 157.353,95.42 157.528,95.42 168.604,84.345 168.604,78.13 168.604,77.185 168.186,76.767 168.186,75.913 168.662,75.438 168.875,75.438 169.214,75.099 169.214,74.865 169.214,74.778 169.106,74.671 168.954,74.671 v3(168.897,74.614)
DDR3_DQS3_P: 1.W5 U26.C7 | length 33
  Top Layer w0.05: 1.W5@152.742,97.918 v3(153.142,97.518)
  Top Layer w0.254: U26.C7@169.335,74.196 v3@169.717,74.577
  Layer 3 w0.104: v3(153.142,97.518) 153.44,97.22 153.859,97.22 155.068,96.011 155.703,96.011 156.089,95.625 156.718,95.625 157.353,95.625 157.613,95.625 168.808,84.43 168.808,78.13 168.808,77.1 168.391,76.683 168.391,75.998 168.747,75.643 168.96,75.643 169.419,75.184 169.419,74.95 169.419,74.778 169.48,74.717 169.515,74.717 169.655,74.577 v3(169.735,74.577)
DDR3_ODT0: R244.2 U25.K1 U26.K1 | length 56.9
  Top Layer w0.254: v4@142.712,68.924 U25.K1@143.094,68.542 ; v4@164.135,68.996 U26.K1@164.516,68.615
  Layer 4 w0.125: v11(139.867,75.082) 140.668,74.281 140.744,74.281 141.492,73.533 141.492,70.162 v4(142.712,68.943) 142.719,68.936 142.966,68.936 143.372,69.342 144.494,69.342 144.637,69.485 146.233,69.485 146.293,69.545 147.12,69.545 147.253,69.412 151.129,69.412 151.39,69.672 152.349,69.672 ; 160.579,69.672 161.874,69.672 162.027,69.52 163.093,69.52 163.581,69.032 164.117,69.032 v4(164.135,69.015)
  Layer 4 w0.205: 152.349,69.672 160.579,69.672
  Bottom Layer w0.131: v11(139.867,75.082) 139.867,77.053 140.183,77.368
  Bottom Layer w0.207: 140.183,77.368 140.323,77.509 149.949,77.509 154.94,82.499 R244.2@154.94,89.593
DDR3_ODT0_FPGA: 1.N5 R244.1 | length 16.3
  Top Layer w0.05: 1.N5@147.942,97.918 v8(148.342,97.518)
  Bottom Layer w0.131: v8(148.342,97.518) 148.738,97.914 150.239,97.914 150.426,98.101 150.426,98.449 150.611,98.634 150.959,98.634 151.001,98.675 154.244,98.675 155.078,97.841 155.444,97.474 155.448,97.474 155.804,97.119 155.804,92.354 154.94,91.491 154.94,91.161
  Bottom Layer w0.207: R244.1@154.94,90.493 154.94,91.161
DDR3_RAS: R235.2 U25.J3 U26.J3 | length 59.2
  Top Layer w0.254: U25.J3@144.712,69.324 144.722,69.324 v4(145.276,69.878) ; U26.J3@166.116,69.396 166.53,69.396 v4(166.725,69.202)
  Layer 4 w0.125: 140.73,77.343 142.102,75.971 142.102,70.485 142.514,70.073 144.596,70.073 144.792,69.878 v4(145.276,69.878) 145.863,69.878 146.369,70.383 149.366,70.383 149.62,70.129 150.519,70.129 150.9,70.51 152.349,70.51 ; 162.001,70.51 162.179,70.333 162.738,70.333 162.916,70.155 165.19,70.155 166.143,69.202 v4(166.725,69.202)
  Layer 4 w0.205: v11(138.317,79.756) 140.73,77.343 ; 152.349,70.51 162.001,70.51
  Bottom Layer w0.207: v11(138.317,79.756) 138.897,80.336 148.778,80.336 151.384,82.941 R235.2@151.384,89.593
DDR3_RAS_FPGA: 1.P4 R235.1 | length 8
  Top Layer w0.05: 1.P4@148.742,97.118 v8(149.142,96.718)
  Bottom Layer w0.131: v8(149.142,96.718) 149.193,96.667 149.193,96.466 149.534,96.126 149.534,95.652 149.667,95.518 150.218,95.518 150.343,95.394 150.343,94.437 150.978,93.802 150.978,92.761 151.384,92.354 R235.1@151.384,90.493
DDR3_RESET: 1.B4 R270.2 U25.T2 U26.T2 | length 83.5
  Top Layer w0.05: v8(138.742,97.518) 1.B4@139.142,97.118
  Top Layer w0.254: v8@143.493,63.342 U25.T2@143.875,63.724 ; v8@164.916,63.414 U26.T2@165.298,63.796
  Bottom Layer w0.131: 134.595,94.615 135.204,94.615 138.107,97.518 v8(138.742,97.518) ; 139.587,68.123 140.019,68.123 141.264,66.878 141.264,63.627 142.09,62.801 142.933,62.801 v8(143.475,63.342) 144.089,63.342 145.099,62.332 161.99,62.332 162.175,62.517 R270.2@163.133,62.517 164,62.517 v8(164.897,63.414)
  Bottom Layer w0.207: 134.595,94.615 130.165,94.615 123.672,88.122 123.672,74.208 125.313,72.568 127.268,72.568 129.605,70.231 135.006,70.231 137.115,68.123 139.587,68.123
DDR3_VREF: 1.H6 1.P6 C78.2 C79.2 C158.1 C159.1 C160.2 C161.2 R232.2 R239.1 U25.H1 U25.M8 U26.H1 U26.M8 | length 80
  Top Layer w0.05: 1.H6@143.942,98.718 v4(144.342,98.318) ; v4(148.342,98.318) 1.P6@148.742,98.718
  Top Layer w0.254: v8@142.693,70.524 U25.H1@143.075,70.142 ; v6@148.293,66.523 U25.M8@148.675,66.905 ; v6(163.682,69.74) 164.125,70.183 164.503,70.183 U26.H1@164.516,70.196 ; v6@169.735,67.396 U26.M8@170.116,67.015
  Layer 4 w0.1: v4(148.342,98.318) 147.166,98.318 146.866,98.618 145.603,98.618 145.491,98.73 144.604,98.73 144.399,98.525 144.399,98.375 v4(144.342,98.318) 143.981,98.679 143.281,98.679 142.977,98.984 142.291,98.984 142.03,98.723 141.75,98.723 141.554,98.528 141.554,90.17 141.554,87.808 151.994,77.368 ; 152.349,77.013 155.702,73.66 155.702,72.923 v11(157.302,71.323)
  Layer 4 w0.125: 151.994,77.368 152.349,77.013
  Bottom Layer w0.1: v8(142.693,70.543) 143.056,70.905 144.552,70.905 145.125,70.333 145.633,70.333 145.76,70.206 145.76,69.985 C158.1@145.887,69.858 C160.2@146.776,69.858 146.776,68.023 v6(148.275,66.523) 148.275,67.051 149.52,68.297 150.201,68.297 151.195,69.291 155.448,69.291 156.346,70.19 156.346,70.367 v11(157.302,71.323) 157.309,71.317 157.788,71.317 R232.2@158.206,70.899 ; C78.2@148.492,98.985 C78.2@148.492,99.06 ; C79.2@159.984,70.874 160.967,70.874 162.1,69.74 v6(163.682,69.74) 164.102,70.159 165.499,70.159 166.08,69.578 167.299,69.578 C159.1@167.385,69.492 ; C161.2@168.274,69.492 C159.1@167.385,69.492 ; v6(169.735,67.415) 169.434,67.114 168.394,67.114 167.385,68.124 C159.1@167.385,69.492
DDR3_WE: R238.2 U25.L3 U26.L3 | length 63.7
  Top Layer w0.254: U25.L3@144.712,67.724 v4@145.094,68.105 ; U26.L3@166.116,67.796 166.144,67.824 166.318,67.824 v4(166.69,68.196)
  Layer 4 w0.125: 139.663,70.903 139.663,69.47 141.42,67.713 144.72,67.713 v4(145.113,68.105) 145.12,68.097 145.639,68.097 146.006,67.73 146.747,67.73 147.117,67.361 148.401,67.361 148.658,67.618 150.303,67.618 150.488,67.433 152.349,67.433 ; 160.579,67.433 162.454,67.433 162.74,67.718 165.367,67.718 165.445,67.64 166.135,67.64 v4(166.69,68.196)
  Layer 4 w0.205: v11(138.343,77.8) 138.343,77.747 138.5,77.591 138.5,76.636 137.244,75.381 137.244,73.322 139.663,70.903 ; 152.349,67.433 160.579,67.433
  Bottom Layer w0.207: v11(138.343,77.8) 138.38,77.837 138.652,77.837 139.737,78.922 149.364,78.922 153.162,82.72 R238.2@153.162,89.593
DDR3_WE_FPGA: 1.M5 R238.1 | length 14
  Top Layer w0.05: 1.M5@147.142,97.918 v8(147.542,97.518)
  Bottom Layer w0.131: v8(147.542,97.518) 148.005,97.055 148.724,97.055 148.791,97.122 149.58,97.122 149.631,97.174 150.429,97.174 150.486,97.117 153.613,97.117 153.975,96.756 153.975,93.04 153.162,92.227 R238.1@153.162,90.493
DL1: IC5.4 R279.1 U27.31 | length 10.7
  Bottom Layer w0.1: U27.31@168.627,102.158 168.627,104.834 168.36,105.101 168.36,108.111 170.155,109.906 IC5.4@170.155,111.983
DL2: IC5.2 R281.1 U27.29 | length 10.2
  Bottom Layer w0.1: IC5.2@167.615,111.983 167.615,109.017 168.11,108.522 168.11,105.683 167.627,105.2 U27.29@167.627,102.158
DONE: 1.R11 R203.1 R205.2 | length 24.1
  Top Layer w0.05: v5(149.142,103.118) 1.R11@149.542,102.718
  Top Layer w0.1: v1(160.841,100.906) 160.414,100.479 159.109,100.479 158.623,100.965 158.623,101.727 161.798,104.902 R203.1@162.618,104.902 R205.2@162.618,105.791
  Layer 6 w0.1: v5(149.142,103.118) 149.142,103.456 149.534,103.849 149.534,104.119 149.686,104.271 154.682,104.271 155.575,103.378 158.369,103.378 v1(160.841,100.906)
dVdT: C231.2 U28.18 | length 2
  Bottom Layer w0.1: C231.2@136.068,169.095 136.195,168.968 136.195,168.3 136.465,168.03 U28.18@136.465,167.284
EN: R283.2 R287.1 U27.23 | length 0.9
  Bottom Layer w0.1: v1(164.059,101.143) 164.14,101.143 164.303,100.98 164.905,100.98 U27.23@164.927,101.002
EN_PWR: C214.1 R280.2 R285.1 U27.5 U27.37 U27.48 | length 2
  Bottom Layer w0.1: v1(169.139,94.412) 169.133,94.418 169.133,95.24 U27.5@169.139,95.246 ; U27.48@171.805,95.98 U27.48@171.805,95.98 v1(171.806,95.428) ; v1(171.806,102.032) 171.806,101.546 171.849,101.502 U27.37@171.871,101.502
ESD_U3_1: P2.9 R6.1 U3.1 | length 12.9
  Top Layer w0.1: P2.9@194.945,56.515 196.088,57.658 R6.1@196.088,63.558
  Bottom Layer w0.1: P2.9@194.945,56.515 196.215,57.785 196.215,59.448 194.975,60.688 U3.1@194.975,60.833
ESD_U3_2: P2.3 R5.2 U3.2 | length 6.7
  Top Layer w0.1: P2.3@194.945,59.055 194.945,61.214 195.326,61.595 195.326,62.611 195.199,62.738 R5.2@195.199,63.558
  Bottom Layer w0.1: U3.2@194.325,60.833 194.325,59.743 194.945,59.123 P2.3@194.945,59.055
ESD_U3_3: P2.10 R8.1 U3.3 | length 12.8
  Top Layer w0.1: P2.10@192.405,56.515 193.675,57.785 193.675,60.833 192.786,61.722 R8.1@192.786,63.558
  Bottom Layer w0.1: P2.10@192.405,56.515 193.675,57.785 U3.3@193.675,60.833
ESD_U3_4: P2.4 R7.2 U3.4 | length 6.7
  Top Layer w0.1: R7.2@191.897,63.558 191.897,59.855 192.405,59.347 P2.4@192.405,59.055
  Bottom Layer w0.1: P2.4@192.405,59.055 192.405,59.123 193.025,59.743 U3.4@193.025,60.833
ESD_U4_1: P2.7 R2.1 U4.1 | length 13.2
  Top Layer w0.1: P2.7@200.025,56.515 201.295,57.785 R2.1@201.295,63.558
  Bottom Layer w0.1: U4.1@199.928,60.833 199.928,60.719 200.033,60.614 200.147,60.614 201.422,59.339 201.422,57.912 P2.7@200.025,56.515
ESD_U4_2: P2.1 R1.2 U4.2 | length 6.7
  Top Layer w0.1: P2.1@200.025,59.055 200.025,60.96 200.406,61.341 R1.2@200.406,63.558
  Bottom Layer w0.1: U4.2@199.278,60.833 199.278,59.802 P2.1@200.025,59.055
ESD_U4_3: P2.8 R4.1 U4.3 | length 12.9
  Top Layer w0.1: P2.8@197.485,56.515 198.755,57.785 198.755,60.452 197.612,61.595 197.612,62.738 197.866,62.992 R4.1@197.866,63.558
  Bottom Layer w0.1: P2.8@197.485,56.515 198.628,57.658 U4.3@198.628,60.833
ESD_U4_4: P2.2 R3.2 U4.4 | length 6.7
  Top Layer w0.1: R3.2@196.977,63.558 196.977,61.214 197.485,60.706 P2.2@197.485,59.055
  Bottom Layer w0.1: P2.2@197.485,59.055 197.485,59.377 197.978,59.87 U4.4@197.978,60.833
ESD_U5_1: P3.9 R18.1 U5.1 | length 13.9
  Top Layer w0.1: R18.1@131.826,61.78 131.826,61.468 133.096,60.198 133.985,60.198 135.128,59.055 135.128,57.404 P3.9@136.398,56.134
  Bottom Layer w0.1: U5.1@135.976,60.83 135.976,60.685 137.541,59.12 137.541,57.277 P3.9@136.398,56.134
ESD_U5_2: P3.3 R17.2 U5.2 | length 7.8
  Top Layer w0.1: R17.2@132.715,61.78 132.715,61.341 133.35,60.706 134.366,60.706 P3.3@136.398,58.674
  Bottom Layer w0.1: U5.2@135.326,60.83 135.326,59.746 P3.3@136.398,58.674
ESD_U5_3: P3.10 R22.1 U5.3 | length 13
  Top Layer w0.1: R22.1@130.048,61.78 130.048,60.579 130.556,60.071 131.445,60.071 132.588,58.928 132.588,57.404 P3.10@133.858,56.134
  Bottom Layer w0.1: P3.10@133.858,56.134 135.001,57.277 135.001,59.309 134.676,59.634 U5.3@134.676,60.83
ESD_U5_4: P3.4 R21.2 U5.4 | length 6.8
  Top Layer w0.1: R21.2@130.937,61.78 130.937,61.214 131.572,60.579 131.953,60.579 P3.4@133.858,58.674
  Bottom Layer w0.1: P3.4@133.858,58.674 133.942,58.758 133.942,60.746 U5.4@134.026,60.83
ESD_U6_1: P3.8 R14.1 U6.1 | length 15.3
  Top Layer w0.1: R14.1@133.604,61.78 133.604,61.341 133.858,61.087 135.636,61.087 137.668,59.055 137.668,57.531 138.938,56.261 P3.8@138.938,56.134
  Bottom Layer w0.1: P3.8@138.938,56.134 140.335,54.737 142.494,54.737 143.685,55.928 143.685,56.268 143.79,56.373 U6.1@143.885,56.373
ESD_U6_2: P3.7 R10.1 U6.2 | length 10.8
  Top Layer w0.1: R10.1@137.287,61.595 137.287,61.087 138.43,59.944 139.446,59.944 140.208,59.182 140.208,57.404 P3.7@141.478,56.134
  Top Layer w0.131: R10.1@137.287,61.595 R10.1@137.287,61.78
  Bottom Layer w0.1: P3.7@141.478,56.134 142.367,57.023 U6.2@143.885,57.023
ESD_U6_3: P3.2 R13.2 U6.3 | length 9.6
  Top Layer w0.1: R13.2@136.398,61.595 136.398,61.214 P3.2@138.938,58.674
  Top Layer w0.131: R13.2@136.398,61.595 R13.2@136.398,61.78
  Bottom Layer w0.1: P3.2@138.938,58.674 140.081,57.531 142.367,57.531 142.509,57.673 U6.3@143.885,57.673
ESD_U6_4: P3.1 R9.2 U6.4 | length 7.4
  Top Layer w0.1: R9.2@138.176,61.78 138.88,61.78 139.573,61.087 139.573,60.579 P3.1@141.478,58.674
  Bottom Layer w0.1: P3.1@141.478,58.674 143.389,58.674 143.74,58.323 U6.4@143.885,58.323
ESD_U7_1: P4.9 R20.1 U7.1 | length 13.1
  Top Layer w0.1: P4.9@90.678,90.678 91.821,89.535 R20.1@97.721,89.535
  Bottom Layer w0.1: P4.9@90.678,90.678 91.948,89.408 93.865,89.408 95.105,90.648 U7.1@95.25,90.648
ESD_U7_2: P4.3 R19.2 U7.2 | length 6.9
  Top Layer w0.1: P4.3@93.218,90.678 95.504,90.678 95.758,90.424 R19.2@97.721,90.424
  Bottom Layer w0.1: P4.3@93.218,90.678 93.286,90.678 93.906,91.298 U7.2@95.25,91.298
ESD_U7_3: P4.10 R24.1 U7.3 | length 13.1
  Top Layer w0.1: P4.10@90.678,93.218 91.948,91.948 95.123,91.948 96.139,92.964 R24.1@97.721,92.964
  Bottom Layer w0.1: P4.10@90.678,93.218 91.948,91.948 U7.3@95.25,91.948
ESD_U7_4: P4.4 R23.2 U7.4 | length 7.1
  Top Layer w0.1: P4.4@93.218,93.218 94.869,93.218 95.504,93.853 R23.2@97.721,93.853
  Bottom Layer w0.1: P4.4@93.218,93.218 93.286,93.218 93.906,92.598 U7.4@95.25,92.598
ESD_U8_1: P4.7 R12.1 U8.1 | length 13.2
  Top Layer w0.1: P4.7@90.678,85.598 91.948,84.328 R12.1@97.721,84.328
  Bottom Layer w0.1: P4.7@90.678,85.598 91.948,84.328 93.98,84.328 94.915,85.263 94.915,85.463 95.02,85.568 U8.1@95.123,85.568
ESD_U8_2: P4.1 R11.2 U8.2 | length 6.8
  Top Layer w0.1: P4.1@93.218,85.598 94.742,85.598 95.123,85.217 R11.2@97.721,85.217
  Bottom Layer w0.1: P4.1@93.218,85.598 93.286,85.598 93.906,86.218 U8.2@95.123,86.218
ESD_U8_3: P4.8 R16.1 U8.3 | length 12.9
  Top Layer w0.1: P4.8@90.678,88.138 91.948,86.868 94.869,86.868 95.758,87.757 R16.1@97.721,87.757
  Bottom Layer w0.1: P4.8@90.678,88.138 91.948,86.868 U8.3@95.123,86.868
ESD_U8_4: P4.2 R15.2 U8.4 | length 6.9
  Top Layer w0.1: P4.2@93.218,88.138 94.615,88.138 95.123,88.646 R15.2@97.721,88.646
  Bottom Layer w0.1: P4.2@93.218,88.138 93.286,88.138 93.906,87.518 U8.4@95.123,87.518
ESD_U9_1: P5.9 R34.1 U9.1 | length 12.8
  Top Layer w0.1: P5.9@117.856,56.134 119.126,57.404 119.126,60.96 118.872,61.214 R34.1@118.872,63.05
  Bottom Layer w0.1: P5.9@117.856,56.134 118.999,57.277 118.999,59.194 117.886,60.307 U9.1@117.886,60.452
ESD_U9_2: P5.3 R33.2 U9.2 | length 6.6
  Top Layer w0.1: P5.3@117.856,58.674 117.856,60.325 118.11,60.579 118.11,62.103 117.983,62.23 R33.2@117.983,63.05
  Bottom Layer w0.1: U9.2@117.236,60.452 117.236,59.362 117.856,58.742 P5.3@117.856,58.674
ESD_U9_3: P5.10 R38.1 U9.3 | length 12.7
  Top Layer w0.1: R38.1@114.935,63.05 114.935,62.357 114.046,61.468 114.046,57.404 P5.10@115.316,56.134
  Bottom Layer w0.1: P5.10@115.316,56.134 116.586,57.404 U9.3@116.586,60.452
ESD_U9_4: P5.4 R37.2 U9.4 | length 6.6
  Top Layer w0.1: P5.4@115.316,58.674 115.316,61.849 115.824,62.357 R37.2@115.824,63.05
  Bottom Layer w0.1: P5.4@115.316,58.674 115.316,58.742 115.936,59.362 U9.4@115.936,60.452
ESD_U10_1: P5.7 R26.1 U10.1 | length 13.5
  Top Layer w0.1: P5.7@122.936,56.134 124.333,57.531 124.333,61.468 123.698,62.103 R26.1@123.698,63.05
  Bottom Layer w0.1: U10.1@122.697,60.452 123.063,60.452 124.333,59.182 124.333,57.531 P5.7@122.936,56.134
ESD_U10_2: P5.1 R25.2 U10.2 | length 6.6
  Top Layer w0.1: R25.2@122.809,63.05 122.809,62.357 122.936,62.23 P5.1@122.936,58.674
  Bottom Layer w0.1: U10.2@122.047,60.452 122.047,59.563 P5.1@122.936,58.674
ESD_U10_3: P5.8 R30.1 U10.3 | length 13
  Top Layer w0.1: P5.8@120.396,56.134 121.666,57.404 121.666,59.817 120.396,61.087 120.396,62.357 120.65,62.611 R30.1@120.65,63.05
  Bottom Layer w0.1: P5.8@120.396,56.134 121.666,57.404 121.666,59.182 121.397,59.451 U10.3@121.397,60.452
ESD_U10_4: P5.2 R29.2 U10.4 | length 6.6
  Top Layer w0.1: R29.2@119.761,63.05 119.761,60.579 120.396,59.944 P5.2@120.396,58.674
  Bottom Layer w0.1: P5.2@120.396,58.674 120.396,59.956 120.747,60.307 U10.4@120.747,60.452
ESD_U11_1: P6.9 R36.1 U11.1 | length 12.7
  Top Layer w0.1: P6.9@178.435,56.388 179.578,57.531 R36.1@179.578,63.177
  Bottom Layer w0.1: P6.9@178.435,56.388 179.705,57.658 179.705,59.563 178.889,60.379 178.57,60.379 178.465,60.484 U11.1@178.465,60.579
ESD_U11_2: P6.3 R35.2 U11.2 | length 6.3
  Top Layer w0.1: P6.3@178.435,58.928 178.435,61.468 178.689,61.722 R35.2@178.689,63.177
  Bottom Layer w0.1: U11.2@177.815,60.579 177.815,59.616 178.435,58.996 P6.3@178.435,58.928
ESD_U11_3: P6.10 R40.1 U11.3 | length 12.3
  Top Layer w0.1: R40.1@175.387,63.177 175.387,61.722 174.625,60.96 174.625,57.658 P6.10@175.895,56.388
  Bottom Layer w0.1: P6.10@175.895,56.388 177.165,57.658 U11.3@177.165,60.579
ESD_U11_4: P6.4 R39.2 U11.4 | length 6.3
  Top Layer w0.1: P6.4@175.895,58.928 175.895,60.96 176.276,61.341 R39.2@176.276,63.177
  Bottom Layer w0.1: P6.4@175.895,58.928 175.895,58.996 176.515,59.616 U11.4@176.515,60.579